# Altium PCB EEM_FMC_Carrier.PcbDoc (part 18 of 19)
Units mm, origin at the board's own origin, x right, y up, seen from the top; angles counter-clockwise.
Board outline 222.9 x 100 mm, 6 copper layers (TopLayer, MidLayer1, MidLayer2, SignalLayer1, Internal Plane 1, BottomLayer), stack 1.528 mm thick; 790 components, 743 nets, 3570 pads, 2277 vias.
Unrouted connection lines stored in the file: 3.
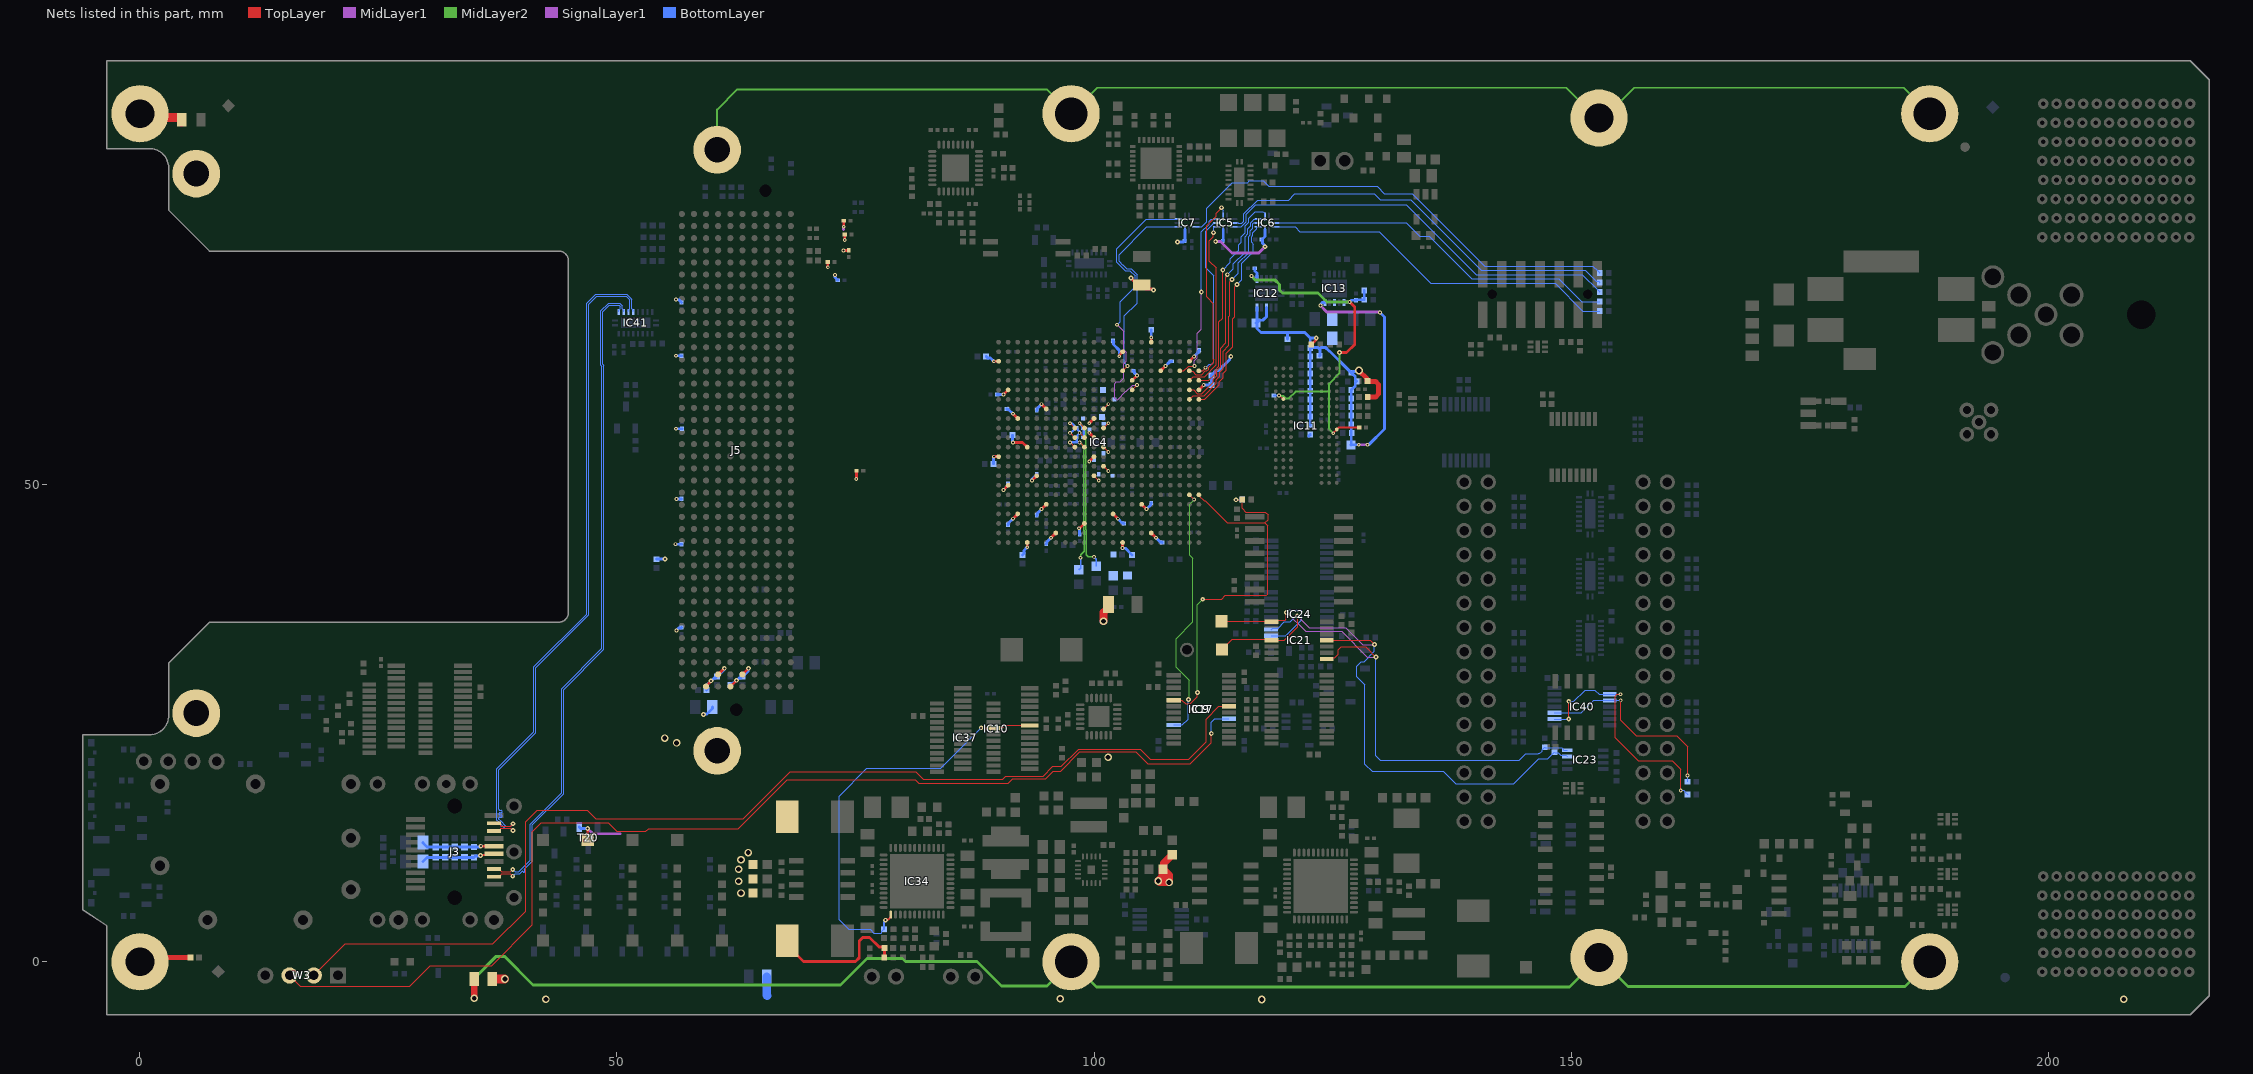
[diagram p20: the nets of this part, all layers, seen from the top]

## Via types
v1: diameter 0.4, hole 0.2, TopLayer to BottomLayer, tented both sides, 1032 vias
v2: diameter 0.5, hole 0.2, TopLayer to BottomLayer, tented both sides, 979 vias
v3: diameter 0.5, hole 0.2, TopLayer to BottomLayer, 162 vias
v4: diameter 0.8, hole 0.5, TopLayer to BottomLayer, tented both sides, 102 vias
v5: diameter 0.6, hole 0.3, TopLayer to BottomLayer, tented both sides, 2 vias

## Nets (pads, with @x,y where several pads share a name; then routed paths per layer and width w, separated by ;. In a path a pad name is that pad's centre, name@x,y a point inside that pad or via, vN(x,y) a via of type N, cw(c..) or ccw(c..) an arc to the next point about the centre after c; other vN are vias at no path point) (continued)
SFP_RD_N: IC41.12 J3.12 | length 68.7
  TopLayer w0.085: J3.12@37.1,8.925 37.65,8.925 37.808,9.082 37.808,9.099 37.928,9.219 38.744,9.219 38.831,9.219 v2(39.075,8.975)
  BottomLayer w0.085: v2(39.075,8.975) 39.319,9.219 39.807,9.219 39.869,9.281 40.03,9.442 cw(c40.095,9.377) 40.161,9.442 40.179,9.423 ccw(c40.245,9.489) 40.31,9.423 ccw(c40.245,9.489) 40.31,9.554 40.291,9.573 cw(c40.357,9.638) 40.291,9.704 40.444,9.856 41.125,10.537 41.125,14.35 44.4,17.625 44.4,28.525 48.637,32.762 48.637,62.513 48.575,62.575 48.525,62.625 48.525,68.15 49.2,68.825 50.219,68.825 50.344,68.7 50.344,68.553 50.344,68.432 50.294,68.382 50.283,68.382 50.2,68.3 IC41.12@50.2,68.125
SFP_RD_P: IC41.13 J3.13 | length 68.8
  TopLayer w0.085: J3.13@37.1,9.725 37.65,9.725 37.808,9.567 37.808,9.551 37.928,9.431 38.024,9.431 38.657,9.431 38.831,9.431 v2(39.075,9.675)
  BottomLayer w0.085: v2(39.075,9.675) 39.319,9.431 39.719,9.431 40.913,10.625 40.913,14.438 44.188,17.713 44.188,28.613 48.425,32.85 48.425,62.425 48.313,62.537 48.313,68.238 49.112,69.037 50.307,69.037 50.556,68.788 50.556,68.64 50.556,68.432 50.606,68.382 50.618,68.382 50.7,68.3 IC41.13@50.7,68.125
SFP_TD_N: IC41.14 J3.19 | length 69.1
  TopLayer w0.085: J3.19@37.1,14.525 37.634,14.525 37.791,14.367 37.791,14.281 37.841,14.231 38.856,14.231 v2(39.1,14.475)
  BottomLayer w0.085: v2(39.1,14.475) 38.856,14.231 38.344,14.231 37.748,14.827 37.625,14.95 37.625,15.046 cw(c37.743,15.046) 37.743,15.163 37.846,15.163 ccw(c37.846,15.281) 37.846,15.398 37.743,15.398 cw(c37.743,15.516) 37.743,15.633 37.846,15.633 ccw(c37.846,15.751) 37.846,15.868 37.743,15.868 cw(c37.743,15.986) 37.625,15.986 37.625,16.228 37.625,20.15 41.487,24.012 41.487,30.825 47.025,36.363 47.025,68.925 47.875,69.775 50.95,69.775 51.344,69.381 51.344,68.432 51.294,68.382 51.282,68.382 51.2,68.3 IC41.14@51.2,68.125
SFP_TD_P: IC41.15 J3.18 | length 69.2
  TopLayer w0.085: J3.18@37.1,13.725 37.634,13.725 37.791,13.882 37.791,13.969 37.841,14.019 38.856,14.019 v2(39.1,13.775)
  BottomLayer w0.085: v2(39.1,13.775) 38.856,14.019 38.256,14.019 37.55,14.725 37.413,14.862 37.413,20.238 41.275,24.1 41.275,30.913 46.813,36.451 46.813,69.013 47.787,69.987 51.038,69.987 51.556,69.469 51.556,68.432 51.606,68.382 51.618,68.382 51.7,68.3 IC41.15@51.7,68.125
SFP_VCCR: C14.2 C17.2 C18.2 C19.2 C20.1 J3.15 L6.1 | length 7.8
  TopLayer w0.25: v2(35.7,11.15) 35.768,11.15 35.818,11.2 36.975,11.2 J3.15@37.1,11.325
  BottomLayer w0.3: L6.1@29.65,10.5 29.65,10.525 30.075,10.95 C20.1@35,10.95 35.16,11.11 35.606,11.11 35.646,11.15 v2(35.7,11.15)
SFP_VCCT: C301.2 C302.2 C303.2 C321.2 C322.1 J3.16 L7.1 | length 7.7
  TopLayer w0.25: v2(35.725,12.125) J3.16@37.1,12.125
  BottomLayer w0.3: L7.1@29.65,12.5 29.65,12.465 30.075,12.04 C301.2@31,12.04 35.586,12.04 35.671,12.125 v2(35.725,12.125)
SHARED_BUS_0: IC6.5 R137.1 | length 37.7
  BottomLayer w0.125: IC6.5@119.023,77.05 121.073,77.05 121.583,76.54 129.885,76.54 135.3,71.125 148.323,71.125 151.248,68.2 R137.1@153.028,68.2
SHARED_BUS_1: IC5.5 R139.1 | length 43.6
  BottomLayer w0.125: IC5.5@114.648,77.05 115.426,77.05 115.948,77.572 115.948,77.75 115.948,78.355 116.968,79.375 132.725,79.375 140.075,72.025 151.203,72.025 152.781,70.447 152.801,70.447 153.028,70.22 R139.1@153.028,70.2
SHARED_BUS_2: IC6.4 R135.1 | length 37.4
  BottomLayer w0.125: IC6.4@119.023,77.45 132.75,77.45 134.126,76.074 135.124,76.074 139.598,71.6 148.698,71.6 151.111,69.187 152.064,69.187 152.076,69.2 R135.1@153.028,69.2
SHARED_BUS_3: IC7.5 R132.1 | length 49.2
  BottomLayer w0.125: IC7.5@110.648,77.05 111.273,77.05 111.8,77.577 111.8,77.916 111.798,77.918 111.798,79 114.483,81.685 116.11,81.685 116.288,81.863 117.737,81.863 118.325,81.275 129.698,81.275 130.448,80.525 133.35,80.525 140.95,72.925 152.303,72.925 152.781,72.447 152.801,72.447 153.028,72.22 R132.1@153.028,72.2
SHARED_BUS_4: IC5.4 R134.1 | length 44
  BottomLayer w0.125: IC5.4@114.648,77.45 114.654,77.444 115.098,77.444 115.13,77.413 115.462,77.413 115.698,77.648 115.698,78.407 117.14,79.85 120.4,79.85 121.05,80.5 129.4,80.5 130.025,79.875 133.192,79.875 140.592,72.475 151.473,72.475 152.624,71.324 152.904,71.324 R134.1@153.028,71.2
SHARED_BUS_DIR_0: IC4.F21 IC6.10 | length 22.5
  TopLayer w0.1: IC4.F21@109.998,59.95 110.43,59.95 110.815,59.565 110.833,59.565 110.837,59.561 111.284,59.561 112.498,60.775 112.498,61.05 112.873,61.425 112.873,61.941 113.287,62.355 113.287,64.339 113.823,64.875 113.823,71.77 113.976,71.923 v2(113.976,72.028)
  BottomLayer w0.125: v2(113.976,72.028) 114.598,72.65 114.598,73.15 115.848,74.4 115.848,76.024 116.125,76.301 116.125,76.85 116.415,77.14 116.415,77.489 116.676,77.75 116.762,77.836 117.209,77.836 IC6.10@117.223,77.85
SHARED_BUS_DIR_1: IC4.D20 IC5.10 | length 18.4
  TopLayer w0.1: IC4.D20@108.998,61.95 109.423,61.95 109.923,62.45 v1(110.523,62.45)
  SignalLayer1 w0.1: v1(110.523,62.45) 110.523,63.014 110.824,63.315 110.824,65.865 111.248,66.289 111.248,66.45 v2(111.248,70.2)
  BottomLayer w0.125: v2(111.248,70.2) 111.248,76.5 112.064,77.316 112.064,77.616 112.198,77.75 112.298,77.85 IC5.10@112.848,77.85
SHARED_BUS_DIR_2: IC4.E22 IC6.1 | length 22.2
  TopLayer w0.1: IC4.E22@110.998,60.95 112.023,60.95 112.684,61.611 112.684,62.019 113.098,62.433 113.098,67.075 113.5,67.477 v2(113.5,72.504)
  BottomLayer w0.125: v2(113.5,72.504) 114.298,73.302 114.298,73.7 115.189,74.591 115.189,75.159 115.437,75.407 115.437,75.996 115.875,76.434 115.875,77.175 116.198,77.498 116.198,77.75 116.198,77.922 116.901,78.625 117.701,78.625 117.832,78.494 117.858,78.494 117.923,78.43 IC6.1@117.923,78.1
SHARED_BUS_DIR_3: IC4.F15 IC7.10 | length 30.1
  TopLayer w0.125: IC4.F15@103.998,59.95 v1(104.498,60.45)
  SignalLayer1 w0.125: v1(102.423,66.775) 102.45,66.775 103.123,66.102 103.123,64.15 103.398,63.875 103.398,62.95 103.123,62.675 103.123,61.175 102.737,60.789 102.358,60.789 102.16,60.59 102.16,60.212 102.16,59.087 102.321,58.925 102.473,58.925 103.337,59.789 103.387,59.789 104.048,60.45 v1(104.498,60.45)
  BottomLayer w0.125: v1(102.423,66.775) 102.748,67.1 102.748,69.2 104.298,70.75 104.298,71.9 103.762,72.436 103.292,72.436 102.409,73.319 102.409,74.761 105.5,77.852 108.189,77.852 108.191,77.85 IC7.10@108.848,77.85
SHARED_BUS_DIR_4: IC4.D21 IC5.1 | length 21.6
  TopLayer w0.1: IC4.D21@109.998,61.95 110.031,61.917 110.331,61.917 110.687,61.561 111.271,61.561 111.646,61.936 111.838,61.936 112.037,62.135 112.037,62.327 112.553,62.843 112.553,63.124 112.498,63.179 112.498,69 111.8,69.698 111.8,77.152 112.398,77.75 112.812,78.164 112.812,78.489 v2(113.373,79.05)
  BottomLayer w0.1: v2(113.373,79.05) 113.373,78.966 113.548,78.791 IC5.1@113.548,78.1
SHARED_BUS_VADJ_0: IC4.G22 IC6.8 | length 21.3
  TopLayer w0.1: IC4.G22@110.998,58.95 111.623,58.95 113.148,60.475 113.148,60.825 113.548,61.225 113.548,61.7 113.848,62 113.848,63.775 114.548,64.475 114.548,67.425 114.748,67.625 114.748,70.75 v2(115.001,71.003)
  BottomLayer w0.125: v2(115.001,71.003) 115.473,71.475 115.473,73.2 116.698,74.425 116.698,75.225 116.522,75.401 116.522,76.009 116.65,76.137 116.65,76.427 117.059,76.836 117.059,77.015 117.093,77.05 IC6.8@117.223,77.05
SHARED_BUS_VADJ_1: IC4.E21 IC5.8 | length 18.7
  TopLayer w0.1: IC4.E21@109.998,60.95 110.398,61.35 111.598,61.35 112.823,62.575 112.823,72.729 112.098,73.454 112.098,75.598 112.522,76.022 v2(112.522,76.427)
  BottomLayer w0.1: v2(112.522,76.427) 112.557,76.461 112.557,77.004 112.603,77.05 IC5.8@112.848,77.05
SHARED_BUS_VADJ_2: IC4.G21 IC6.9 | length 22.4
  TopLayer w0.1: IC4.G21@109.998,58.95 110.399,59.351 111.549,59.351 112.823,60.625 112.823,61 113.198,61.375 113.198,61.8 113.548,62.15 113.548,64.025 114.148,64.625 114.148,67.65 114.223,67.725 114.223,71.275 v2(114.476,71.528)
  BottomLayer w0.125: v2(114.476,71.528) 115.098,72.15 115.098,73.25 116.198,74.35 116.198,75.987 116.4,76.189 116.4,76.652 116.648,76.9 116.648,77.35 116.748,77.45 IC6.9@117.223,77.45
SHARED_BUS_VADJ_3: IC4.D14 IC7.8 | length 21.6
  TopLayer w0.125: IC4.D14@102.998,61.95 v1(103.498,62.45)
  BottomLayer w0.125: v1(103.498,62.45) 103.173,62.775 103.173,66.45 103.173,67.7 104.512,69.039 104.512,72.036 103.898,72.65 103.423,72.65 103,73.074 102.957,73.074 102.623,73.407 102.623,74.125 105.547,77.048 108.189,77.048 108.191,77.05 IC7.8@108.848,77.05
SHARED_BUS_VADJ_4: IC4.D22 IC5.9 | length 17.3
  TopLayer w0.1: IC4.D22@110.998,61.95 111.373,61.95 v1(111.698,62.275)
  BottomLayer w0.125: v1(111.698,62.275) 112.055,62.632 112.36,62.632 112.566,62.838 112.566,62.918 112.573,62.925 112.573,71.9 111.723,72.75 111.723,76.6 112.51,77.387 112.51,77.392 IC5.9@112.568,77.45
SPI_SCL: B3.1 IC21.4 IC21.11 IC23.3 IC24.2 R103.1 | length 65.5
  TopLayer w0.125: B3.1@113.4,32.725 114.509,33.834 118.464,33.834 IC21.4@118.598,33.7 119.948,33.7 121.35,35.102 121.35,36.2 v2(121.3,36.25) ; IC21.11@124.398,33.7 128.975,33.7 v2(129.4,33.275)
  SignalLayer1 w0.125: v2(121.3,36.25) 122.55,35 126.398,35 128.153,33.245 v2@129.37,33.245
  BottomLayer w0.125: IC24.2@118.56,34.825 118.722,34.987 119.317,34.987 119.954,35.625 120.575,35.625 121.2,36.25 v2(121.3,36.25) ; v2(129.4,33.275) 129.4,32.55 128.323,31.473 128.023,31.473 127.55,31 127.55,29.875 128.396,29.029 128.396,20.7 129.146,19.95 136.625,19.95 137.9,18.675 144,18.675 146.623,21.298 147.546,21.298 148.228,21.98 R103.1@148.248,21.98 148.325,21.903 148.672,21.903 148.925,21.65 149.473,21.65 IC23.3@149.598,21.525
SPI_SDA: B2.1 IC21.1 IC21.8 IC23.4 IC24.1 R102.1 | length 63.2
  TopLayer w0.125: B2.1@113.375,35.7 118.548,35.7 IC21.1@118.598,35.65 118.761,35.813 120.037,35.813 120.175,35.95 v2(120.175,36.625) ; IC21.8@124.398,31.75 124.53,31.882 125.232,31.882 125.6,32.25 125.6,32.7 125.925,33.025 128.475,33.025 v2(129.55,31.95)
  SignalLayer1 w0.125: v2(120.175,36.625) 122.175,34.625 125.975,34.625 128.65,31.95 v2(129.55,31.95)
  BottomLayer w0.125: IC24.1@118.56,34.175 120.1,34.175 121.8,35.875 121.8,36.675 121.574,36.902 120.452,36.902 v2(120.175,36.625) ; v2(129.55,31.95) 129.55,21.619 130.019,21.15 144.575,21.15 145.244,21.819 146.581,21.819 146.61,21.849 146.741,21.849 146.977,22.084 146.977,22.168 147,22.192 147,22.253 147.228,22.48 R102.1@147.248,22.48 ; R102.1@147.249,22.479 147.307,22.421 149.021,22.421 149.11,22.332 149.11,22.312 149.248,22.175 IC23.4@149.598,22.175
STRIP1: B6.1 B7.1 B8.1 B9.1 C212.1 M1.1 M2.1 M3.1 M4.1 M5.1 M6.1 M7.1 M8.1 R120.2 R126.1 | length 315.6
  TopLayer w0.5: M4.1@0,0 0.45,0.45 C212.1@5.298,0.45
  TopLayer w0.7: v4(35.048,-3.825) R120.2@35.048,-1.8
  TopLayer w0.9: M3.1@0,88.9 0.4,88.5 4.35,88.5 R126.1@4.35,88
  MidLayer2 w0.2: B8.1@60.5,85.119 60.5,89.325 62.625,91.45 95.05,91.45 M5.1@97.6,88.9 100.324,91.624 149.501,91.624 152.675,88.45 M1.1@152.93,88.45 153.193,88.713 153.713,88.713 156.624,91.624 184.876,91.624 M6.1@187.6,88.9
  MidLayer2 w0.3: v4(35.048,-3.825) 35.048,-1.727 37.35,0.575 38.2,0.575 41.2,-2.425 73.432,-2.425 76.217,0.36 79.91,0.36 80.245,0.025 87.75,0.025 90.3,-2.525 95.075,-2.525 M7.1@97.6,0 100.249,-2.649 149.831,-2.649 M2.1@152.93,0.45 155.98,-2.6 185,-2.6 M8.1@187.6,0
STRIP2: R119.1 | length 2
  BottomLayer w0.9: R119.1@65.698,-1.55 65.698,-3.5 65.748,-3.55
  other v4: 42.548,-3.925 96.473,-3.875
STRIP3: R120.1 | length 1.3
  TopLayer w0.9: R120.1@36.948,-1.8 v4(38.248,-1.8)
  other v4: 117.573,-3.95 207.937,-3.93
Switch_I2C.SCL: IC40.2 IC40.9 R77.2 | length 25.9
  TopLayer w0.114: v2(149.761,25.441) v2(149.76,27.301) ; v1(155.2,28.05) 155.172,28.022 154.797,28.022 154.625,27.85 154.625,23.505 157.073,21.057 160.629,21.057 161.504,20.181 161.504,17.961 v1(161.5,17.958)
  BottomLayer w0.114: IC40.9@148.254,25.446 148.278,25.423 149.742,25.423 v2(149.761,25.441) ; v2(149.76,27.301) 150.301,27.301 151.488,28.488 152.512,28.488 152.954,28.046 IC40.2@154.054,28.046 155.196,28.046 v1(155.2,28.05) ; v1(161.5,17.958) 161.797,17.958 R77.2@161.976,17.779 ; R77.2@161.977,17.779 162.21,17.546 R77.2@162.21,17.526
Switch_I2C.SDA: IC40.3 IC40.10 R3.2 | length 21.4
  TopLayer w0.114: v1(155.205,27.41) 155.205,25.32 156.852,23.673 161.086,23.673 162.242,22.517 162.242,19.553 v1(162.212,19.524)
  BottomLayer w0.114: IC40.10@148.254,26.096 151.079,26.096 152.379,27.396 IC40.3@154.054,27.396 154.065,27.407 155.201,27.407 v1(155.205,27.41) ; R3.2@162.21,18.872 162.21,19.522 v1(162.212,19.524)
UART_RXD: IC9.19 W3.2 | length 116.8
  TopLayer w0.125: W3.2@18.215,-1.425 21.515,1.875 37,1.875 40.45,5.325 40.45,14.7 41.625,15.875 46.875,15.875 47.75,15 63.223,15 68.159,19.936 81.312,19.936 82.123,19.125 90.425,19.125 90.75,19.45 94.673,19.45 95.698,20.475 96.559,20.475 98.379,22.294 104.856,22.294 105.904,21.246 109.946,21.246 111.748,23.048 111.748,25.45 113.073,26.775 IC9.19@114.148,26.775
UART_RXD_2V5: IC4.U22 IC9.5 R35.1 R36.2 | length 42.5
  TopLayer w0.125: IC9.5@108.348,27.425 109.223,27.425 109.623,27.025 110.098,27.025 110.848,27.775 v2(110.848,28.225) ; IC4.U22@110.998,48.95 110.998,48.87 111.545,48.322 111.652,48.322 113.975,46 117.898,46 ; v2(111.398,38) 113.375,38 113.775,38.4 118.048,38.4 118.192,38.544 118.192,45.706 118.093,45.805 117.898,46 ; v2(114.873,48.425) 115.47,48.425 R35.1@115.511,48.467 ; R35.1@115.528,48.45 115.528,48.425 115.528,47.52 115.899,47.149 117.949,47.149 118.254,46.844 118.254,46.356 117.898,46
  MidLayer2 w0.125: v2(110.848,28.225) 110.848,37.45 v2(111.398,38)
  BottomLayer w0.125: v2(114.873,48.425) 115.478,48.425 R36.2@115.528,48.475
UART_TXD: IC17.20 W3.3 | length 119.6
  TopLayer w0.125: W3.3@15.675,-1.425 16.8,-2.55 28.275,-2.55 30.425,-0.4 36.85,-0.4 41.125,3.875 41.125,13.65 42.05,14.575 49.075,14.575 49.975,13.675 53.025,13.675 53.314,13.964 62.712,13.964 67.848,19.1 81.248,19.1 81.623,18.725 91.012,18.725 91.474,19.187 91.63,19.187 ; 91.631,19.188 93.465,19.188 ; 93.466,19.187 94.917,19.187 95.73,20 96.518,20 98.52,22.002 104.398,22.002 105.65,20.75 110.075,20.75 112.298,22.973 v2(112.298,23.925)
  BottomLayer w0.125: v2(112.298,23.925) 112.298,25.1 112.673,25.475 IC17.20@114.148,25.475
UART_TXD_2V5: IC4.U21 IC17.4 | length 27.2
  TopLayer w0.125: IC4.U21@109.998,48.95 v1(110.498,48.45)
  MidLayer2 w0.125: v2(109.898,27.5) 109.969,27.571 109.969,29.529 108.598,30.9 108.598,33.871 110.373,35.646 110.373,42.279 110.202,42.45 110.023,42.629 110.023,47.975 v1(110.498,48.45)
  BottomLayer w0.125: IC17.4@108.348,24.825 109.273,24.825 109.898,25.45 v2(109.898,27.5)
VADJ_ENABLE: IC10.8 IC34.37 IC37.20 R221.2 | length 43.5
  TopLayer w0.125: v2(88.175,24.525) 89.45,24.525 90.45,24.525 90.7,24.775 IC10.8@93.248,24.775
  TopLayer w0.2: v2(78.13,4.369) 78.188,4.426 78.428,4.426 78.7,4.698 IC34.37@78.7,4.949
  BottomLayer w0.125: R221.2@77.998,3.42 77.978,3.42 77.75,3.193 77.75,3.072 77.677,2.999 76.925,2.999 76.523,3.4 74.298,3.4 73.273,4.425 73.273,17.375 76.168,20.27 83.92,20.27 v2(88.175,24.525)
  BottomLayer w0.2: R221.2@77.998,3.42 77.998,4.155 78.13,4.288 v2(78.13,4.369)
VADJ_FMC: C49.2 C50.2 C51.2 C100.2 C115.2 C116.2 C117.2 C118.2 C119.2 C120.2 C121.2 C122.2 C123.2 C124.2 C125.2 C126.2 C127.2 C128.2 C129.2 C130.2 C131.2 C132.2 C133.2 C134.2 C141.2 C142.2 C143.2 C144.2 C171.2 C176.2 C193.2 C194.2 C195.2 C196.2 C197.1 C198.1 C206.2 C261.2 C272.2 C273.2 C274.2 C290.2 C291.2 C292.2 C293.2 C294.2 C295.2 C296.2 C297.2 IC4.A17 IC4.AA7 IC4.AA17 IC4.AB4 IC4.AB14 IC4.B14 IC4.C1 IC4.C21 IC4.D18 IC4.E15 IC4.F2 IC4.F22 IC4.H6 IC4.J3 IC4.M4 IC4.N1 IC4.R5 IC4.T2 IC4.V6 IC4.V16 IC4.W3 IC4.W13 IC4.Y10 IC5.7 IC6.7 IC7.7 J5.e39 J5.f40 J5.g39 J5.h40 L24.2 L25.2 R17.2 R215.2 T20.1 TP10.1 | length 96.1
  TopLayer w0.3: v2(46.925,13.975) 46.937,13.963 TP10.1@46.937,12.75 ; J5.h40@59.338,28.859 59.338,28.899 59.848,29.409 v2(59.848,29.45) ; J5.g39@60.608,30.129 61.239,30.76 v2(61.248,30.76) ; J5.f40@61.878,28.859 61.881,28.859 62.524,29.502 v2(62.526,29.502) ; J5.e39@63.148,30.129 63.779,30.76 v2(63.788,30.76) ; L24.2@67.848,2.2 67.848,1.7 68.898,0.65 68.91,0.65 69.535,0.025 74.998,0.025 75.398,0.425 75.398,2.183 75.754,2.539 76.484,2.539 77.482,1.541 77.957,1.541 C261.2@78.048,1.45 78.048,0.47 R215.2@78.028,0.45 ; v1(72.098,72.8) C293.2@72.098,73.35 ; v1@73.751,74.574 C171.2@74.298,74.575 ; v1(73.773,77.05) C290.2@73.773,77.675 ; v1(73.873,75.65) C176.2@73.873,76.25 ; v1(75.075,50.602) 75.075,50.629 75.098,50.652 C193.2@75.098,51.475 ; v1(89.498,52.95) IC4.N1@89.998,52.95 ; v1(89.498,62.95) IC4.C1@89.998,62.95 ; v1(90.498,49.45) IC4.T2@90.998,49.95 ; v1(90.498,59.45) IC4.F2@90.998,59.95 ; v1(91.498,46.45) IC4.W3@91.998,46.95 ; v1(91.498,54.45) 92.498,54.45 IC4.M4@92.998,53.95 ; v1(91.498,57.45) IC4.J3@91.998,56.95 ; v1(92.998,43.45) IC4.AB4@92.998,43.95 ; v1(93.498,50.45) IC4.R5@93.998,50.95 ; v1(94.498,47.45) IC4.V6@94.998,47.95 ; v1(94.498,58.45) IC4.H6@94.998,57.95 ; v1(95.498,44.45) IC4.AA7@95.998,44.95 ; v1(98.43,45.45) 98.449,45.469 98.517,45.469 IC4.Y10@98.998,45.95 ; IC4.W13@101.998,46.95 v1(102.498,46.45) ; v1(102.648,63.475) 102.667,63.494 102.667,63.619 IC4.B14@102.998,63.95 ; v1(102.998,43.375) IC4.AB14@102.998,43.95 ; v2(103.873,71.675) 104.173,71.375 104.573,71.375 C100.2@104.998,70.95 105.423,70.525 106.094,70.525 106.194,70.425 v2(106.248,70.425) ; IC4.E15@103.998,60.95 v1(104.498,61.45) ; IC4.V16@104.998,47.95 v1(105.498,47.45) ; IC4.AA17@105.998,44.95 v1(106.498,44.45) ; IC4.A17@105.998,64.95 v1(105.998,65.45) ; IC4.D18@106.998,61.95 v1(107.498,62.45) ; IC4.C21@109.998,62.95 v1(110.498,63.45) ; IC4.F22@110.998,59.95 v1(111.498,60.45)
  MidLayer1 w0.3: v2(46.925,13.975) 47.475,13.425 50.325,13.425 ; 73.754,76.756 73.754,77.031 v1(73.773,77.05)
  SignalLayer1 w0.3: v2(112.75,75.5) 113.248,75.5 114.448,74.3 117.276,74.3 v2(117.926,74.95)
  BottomLayer w0.3: T20.1@46.05,14.15 46.05,14.125 46.2,13.975 v2(46.925,13.975) ; R17.2@54.15,42.22 54.153,42.223 55.023,42.223 v2(55.025,42.225) ; v1(56.148,43.775) C296.2@56.773,43.775 ; v1@56.164,69.45 v1(56.194,69.42) 56.213,69.401 56.472,69.401 56.698,69.175 56.723,69.175 56.773,69.125 C294.2@56.773,69.1 ; v1(56.173,55.875) C295.2@56.798,55.875 ; v1(56.198,63.525) C292.2@56.773,63.525 ; v1(56.223,34.725) 56.473,34.975 56.723,34.975 56.773,35.025 C297.2@56.773,35.05 ; v1(56.223,48.525) C291.2@56.773,48.525 ; v2(59.08,25.934) 59.119,25.972 59.42,25.972 59.998,26.55 C197.1@59.998,26.725 ; C198.1@59.373,28.5 59.464,28.591 59.464,29.066 v2(59.848,29.45) ; v2@59.902,29.45 60.192,29.74 60.338,29.74 C206.2@60.498,29.9 61.21,30.612 v2@61.21,30.722 ; C195.2@61.873,29 62.033,29.16 62.13,29.16 v2@62.472,29.502 ; v2@62.58,29.502 62.819,29.74 63.013,29.74 C196.2@63.173,29.9 63.75,30.477 v2@63.75,30.722 ; v1(72.848,72) 72.848,71.75 73.073,71.525 73.073,71.5 73.123,71.45 C194.2@73.148,71.45 ; C130.2@88.698,63.45 88.858,63.29 89.158,63.29 v1(89.498,62.95) ; C131.2@89.448,52.2 89.448,52.873 89.498,52.923 v1(89.498,52.95) ; C127.2@89.848,59.45 v1(90.498,59.45) ; v1(90.498,49.45) 90.948,49.9 90.948,50.05 C133.2@90.998,50.1 ; C122.2@90.848,57.95 90.898,57.9 91.048,57.9 v1(91.498,57.45) ; C141.2@90.998,45.8 91.048,45.85 91.048,46 v1(91.498,46.45) ; C121.2@91.448,55.2 91.448,54.527 91.498,54.477 v1(91.498,54.45) ; C116.2@92.498,42.65 92.658,42.81 92.658,43.11 v1(92.998,43.45) ; v1(93.498,50.45) 93.517,50.469 93.517,50.619 93.923,51.025 93.948,51.025 93.998,51.075 C132.2@93.998,51.1 ; C144.2@93.998,46.8 94.048,46.85 94.048,47 v1(94.498,47.45) ; C143.2@93.998,57.8 94.048,57.85 94.048,58 v1(94.498,58.45) ; C123.2@94.998,43.8 95.048,43.85 95.048,44 v1(95.498,44.45) ; v1(98.43,45.45) 98.43,45.423 98.498,45.355 C118.2@98.498,44.8 ; C129.2@101.998,65.1 102.048,65.05 102.048,64.7 102.648,64.1 v1(102.648,63.475) ; v1(102.498,46.45) 102.948,46 103.098,46 C134.2@103.148,45.95 ; v1(102.998,43.375) 103.017,43.356 103.292,43.356 C120.2@103.998,42.65 ; C128.2@104.148,61.95 104.173,61.95 104.223,61.9 104.223,61.752 104.498,61.477 v1(104.498,61.45) ; v1(105.498,47.45) 105.948,47.9 105.948,48.05 C119.2@105.998,48.1 ; v1(105.998,65.45) C125.2@105.998,66.25 ; v1(106.498,44.45) 106.948,44 107.098,44 C117.2@107.148,43.95 ; v1(107.498,62.45) 107.948,62.9 108.098,62.9 C142.2@108.148,62.95 ; v2(108.748,75.45) 109.398,75.45 109.423,75.475 109.448,75.475 109.498,75.525 C51.2@109.498,75.55 109.523,75.575 109.523,76.725 IC7.7@109.548,76.75 ; v1(110.498,63.45) 110.948,63.9 110.948,64.05 C124.2@110.998,64.1 ; v1(111.498,60.45) C126.2@112.298,60.45 C115.2@112.298,61.45 112.649,61.801 112.649,61.859 112.789,61.999 113.072,61.999 114.223,63.15 114.223,63.274 114.339,63.389 v2(114.339,63.443) v2@114.345,63.45 ; v2@112.723,75.5 v2(112.75,75.5) 113.448,75.5 C49.2@113.498,75.55 113.498,75.575 113.548,75.625 IC5.7@113.548,76.75 ; C50.2@117.598,75.7 117.623,75.7 C50.2@117.673,75.75 ; IC6.7@117.923,76.75 117.923,76.025 117.673,75.775 C50.2@117.673,75.75 ; v2(117.926,74.95) 117.888,74.988 117.888,75.11 117.673,75.325 C50.2@117.673,75.75
  other v1: 73.75,74.574
  other v4: 62.998,7.2 62.748,8.45 62.748,9.7 62.998,10.7 63.748,11.45 56.248,22.95 54.998,23.45
VCCAUX: C157.2 C158.2 C159.2 C160.2 C161.2 C162.2 C163.2 C164.2 C174.2 IC4.H12 IC4.K12 IC4.M12 IC4.P12 IC4.R11 L5.2 | length 3.5
  TopLayer w0.125: IC4.R11@99.998,50.95 v1(100.498,50.45) ; IC4.P12@100.998,51.95 v1(101.498,51.45) ; IC4.M12@100.998,53.95 v1(101.498,53.45) ; IC4.K12@100.998,55.95 v1(101.498,56.45) ; IC4.H12@100.998,57.95 v1(101.498,58.45)
VCCBRAM: C110.2 C112.2 C113.2 C243.2 C320.2 IC4.J11 IC4.L11 IC4.N11 L16.2 | length 10.1
  TopLayer w0.3: v1(99.498,52.45) IC4.N11@99.998,52.95 ; v1(99.498,55.45) IC4.L11@99.998,54.95 ; v1(99.498,56.45) IC4.J11@99.998,56.95
  TopLayer w0.8: v4(100.998,35.7) 100.998,36.625 101.498,37.125 C110.2@101.498,37.45 ; L16.2@108.1,11.117 107.323,10.34 107.323,9.775 C243.2@107.248,9.7 ; C243.2@107.248,9.7 107.873,9.075 v4(107.873,8.325) 106.873,8.325 v4(106.723,8.475) 107.173,8.925 107.173,9.625 C243.2@107.248,9.7
  other v4: 101.475,21.45
VREF_DDR3: C78.2 C79.2 C93.2 C95.2 IC11.H1 IC11.M8 IC12.6 IC13.1 R74.1 R75.2 | length 42.6
  TopLayer w0.167: v1(119.405,59.36) 119.447,59.36 119.807,59 IC11.M8@119.848,59 ; v1(125.073,55.4) 125.073,55.425 IC11.H1@125.448,55.8
  TopLayer w0.2: IC11.H1@125.448,55.8 125.642,55.994 C79.2@127.915,55.994
  TopLayer w0.3: v2(125.723,63.875) 126.481,63.875 127.325,64.719 127.325,68.644 v1(126.8,69.169)
  MidLayer2 w0.2: v1(119.405,59.36) 119.444,59.322 119.825,59.322 120.091,59.055 120.421,59.055 121.128,59.762 124.648,59.762 ; 124.648,60.6 124.648,59.762 ; 124.662,60.614 125.723,61.675 v2(125.723,63.875) ; v1(125.073,55.4) 124.648,55.825 124.648,59.762
  MidLayer2 w0.3: v1(116.5,71.894) 116.944,71.45 118.994,71.45 119.45,70.994 119.45,70.394 119.744,70.1 123.494,70.1 124.425,69.169 v1(126.8,69.169)
  BottomLayer w0.2: C78.2@118.848,59.375 118.856,59.367 119.398,59.367 v1(119.405,59.36)
  BottomLayer w0.3: v1(116.5,71.894) 116.731,71.663 117.067,71.663 IC12.6@117.07,71.573 117.07,72.199 116.848,72.421 C93.2@116.848,72.7 ; IC13.1@126.2,69.094 126.275,69.169 v1(126.8,69.169) 126.975,69.344 C95.2@127.45,69.344 127.5,69.394 R74.1@128.33,69.394 R75.2@128.33,70.369
VTT_DDR3: C89.2 C90.2 C96.2 C304.2 IC12.3 IC12.5 IC13.3 IC13.5 R42.2 R43.2 R46.2 R47.2 R48.2 R49.2 R50.2 R51.2 R52.2 R53.2 R54.2 R55.2 R56.2 R57.2 R58.2 R59.2 R60.2 R61.2 R62.2 R63.1 R64.1 R65.1 R247.2 R248.2 | length 66.7
  TopLayer w0.3: R48.2@122.778,64.7 122.778,64.72 122.918,64.86 122.938,64.86 123.26,65.182 123.26,65.337 v2(123.298,65.375)
  TopLayer w0.5: v4(127.773,61.975) 128.628,61.12 128.628,60.92 R56.2@128.708,60.84 ; R43.2@128.718,59.2 129.514,59.2 129.807,59.493 129.807,60.547 129.514,60.84 R56.2@128.708,60.84 ; R56.2@128.728,60.84 R56.2@128.708,60.84
  SignalLayer1 w0.3: v1(123.725,68.794) 124.4,68.119 129.925,68.119 v1(129.975,68.069) ; v1(127.75,54.194) v1(128.675,54.194)
  BottomLayer w0.3: C90.2@116.998,66.95 117.07,67.022 IC12.5@117.07,68.573 ; IC12.3@118.07,68.573 118.07,67.622 117.691,67.243 117.323,67.243 117.07,66.991 117.07,66.378 117.498,65.95 120.323,65.95 ; R47.2@120.298,65.27 120.298,65.925 120.323,65.95 ; 122.268,65.8 122.668,65.4 ; R65.1@122.508,55.115 122.528,55.115 122.668,55.255 R65.1@122.668,55.275 ; R63.1@122.668,56.25 R64.1@122.668,57.15 R51.2@122.668,58.05 R42.2@122.668,58.95 R49.2@122.668,59.85 R57.2@122.668,60.75 R60.2@122.668,61.65 R55.2@122.668,62.55 R50.2@122.668,63.45 R53.2@122.668,64.35 122.668,65.4 ; R53.2@122.668,64.375 123.472,64.375 123.648,64.199 ; v2(123.298,65.375) 123.273,65.4 122.668,65.4 ; R52.2@123.648,63.52 123.698,63.57 123.698,64.26 123.813,64.375 124.298,64.375 124.648,64.025 124.693,64.025 126.808,61.91 126.828,61.91 126.968,61.77 R54.2@126.968,61.75 127.097,61.879 127.677,61.879 v4(127.773,61.975) ; v1(123.725,68.794) 123.725,68.894 123.925,69.094 IC13.5@124.2,69.094 ; C89.2@126.923,54.175 C89.2@126.942,54.194 ; R54.2@126.968,61.73 127.108,61.59 127.128,61.59 127.378,61.34 127.378,60.99 R59.2@127.518,60.85 127.378,60.71 127.378,60.36 127.128,60.11 127.108,60.11 126.968,59.97 R62.2@126.968,59.95 R58.2@126.968,59.05 R61.2@126.968,58.15 R247.2@126.968,57.25 R248.2@126.968,56.35 126.968,54.22 C89.2@126.942,54.194 ; v1(127.75,54.194) C89.2@126.942,54.194 ; v1(128.675,54.194) 128.8,54.194 130.45,55.844 130.45,67.594 v1(129.975,68.069) ; 120.323,65.95 122.098,65.95 122.648,65.4 122.668,65.4
XADC_GND: C97.1 C98.1 IC4.K9 IC4.L9 IC4.L10 IC4.M9 IC4.M10 L4.2 | length 21.6
  TopLayer w0.125: v1(97.498,54.45) IC4.M9@97.998,53.95 ; v1(97.498,55.45) IC4.L9@97.998,54.95 ; v1(97.498,56.45) IC4.K9@97.998,55.95 ; v1(98.498,54.45) IC4.M10@98.998,53.95 ; v1(98.498,55.45) IC4.L10@98.998,54.95
  MidLayer2 w0.15: v1(98.498,54.45) 98.921,54.027 98.921,45.211 98.958,45.173 98.958,43.01 98.598,42.65 v1(98.598,42.35)
  BottomLayer w0.15: L4.2@98.423,41.1 98.598,41.275 v1(98.598,42.35)
  BottomLayer w0.25: v1(97.498,55.45) 98.048,55.875 98.148,55.906 98.217,55.906 98.248,55.875 98.248,55.806 98.469,55.585 98.469,55.479 v1(98.498,55.45) C97.1@98.083,55.035 ; v1(97.498,56.45) 97.527,56.421 97.677,56.421 98.048,56.05 98.048,56.025 98.123,55.95 C98.1@98.148,55.95 ; v1@97.567,54.458 97.567,54.479 98.176,54.479 ; C97.1@98.151,54.991 98.176,54.991 98.176,54.599 98.296,54.479 98.469,54.479 v1(98.498,54.45)
XADC_VCC: C97.2 C98.2 IC4.K10 L3.2 | length 18.4
  TopLayer w0.125: v1(98.498,56.45) IC4.K10@98.998,55.95
  MidLayer2 w0.15: v1(98.498,56.45) 99.147,55.801 99.147,45.305 99.187,45.265 99.187,42.661 99.398,42.45 v1(99.998,42.45)
  BottomLayer w0.15: v1(99.998,42.45) 100.248,42.2 L3.2@100.248,41.45
  BottomLayer w0.279: v1(98.498,56.45) 98.498,56.417 98.763,56.153 98.763,56.01 98.823,55.95 C98.2@98.848,55.95 ; C97.2@98.851,54.991 98.866,54.991 98.927,55.051 98.927,55.89 C98.2@98.88,55.936
pads on no net: D1.2 D2.2 D5.5 D6.5 D8.5 FTG1.FTG2 FTG2.1 FTG3.1 FTG4.1 FTG5.1 FTG6.1 IC1.9 IC1.11 IC1.12 IC1.13 IC1.14 IC1.17 IC1.18 IC1.19 IC1.20 IC1.21 IC1.22 IC2.1 IC2.4 IC2.6 IC2.14 IC2.19 IC2.21 IC2.22 IC2.30 IC2.31 IC3.14 IC3.15 IC4.K13 IC4.L6 IC4.U7 IC4.V7 IC4.Y17 IC8.5 IC8.6 IC8.7 IC8.8 IC8.10 IC8.11 IC8.12 IC8.13 IC8.14 IC8.15 IC8.16 IC8.17 IC9.9 IC9.10 IC10.11 IC10.14 IC10.19 IC11.J1 IC11.J9 IC11.L1 IC11.L9 IC11.M7 IC14.4 IC15.14 IC15.15 IC15.16 IC15.17 IC17.15 IC17.16 IC17.17 IC17.18 IC17.19 IC22.3 IC22.4 IC22.5 IC22.6 IC22.11 IC22.12 IC22.13 IC24.3 IC25.7 IC26.7 IC29.7 IC29.8 IC29.12 IC29.13 IC29.16 IC29.17 IC31.3 IC31.5 IC31.6 IC32.22 IC32.26 IC32.27 IC32.28 IC32.29 IC34.22 IC35.4 IC42.5 IC43.5 IC44.1 IC44.2 IC44.3 IC44.4 IC44.5 IC44.6 IC44.7 IC44.8 IC44.11 IC44.14 IC44.19 IC44.28 IC45.11 IC45.13 IC45.14 IC45.15 IC45.16 IC45.17 IC45.18 IC45.19 IC45.20 IC46.10 IC46.11 IC46.16 J2.12 J2.15 J2.16 J3.MTG1 J3.MTG2 J5.1 J5.2 J5.b40 J6.B1 J6.L2 J7.A3 J7.A5 J7.A7 J7.A8 J7.B2 J7.B3 J7.B4 J7.B5 J7.B6 J7.B7 J7.B8 J7.C2 J7.C4 J7.C6 J7.C8 J7.D3 J7.D5 J7.D7 J7.D8 J7.E2 J7.E3 J7.E4 J7.E5 J7.E6 J7.E7 J7.E8 J7.F2 J7.F4 J7.F6 J7.F8 J7.G3 J7.G5 J7.G7 J7.H2 J7.H3 J7.H4 J7.H5 J7.H6 J7.H7 J7.H8 J7.I2 J7.I4 J7.I6 J7.I8 J7.J3 J7.J5 J7.J7 J7.K2 J7.K3 J7.K4 J7.K5 J7.K6 J7.K7 J7.K8 J7.L2 J7.L4 J7.L6 J7.L8 J10.5 LD2.3 LD13.3 LD15.3 LD18.3 OSC1.2 T7.1 T7.2 T7.7 T7.8 TR1.2

## Polygon pours and split planes (outlines as drawn)
no net on TopLayer "BAL_TOP" (solid, pour order 240): -5.9,91.899 -5.9,-3.4 216.958,-3.4 216.873,-3.315 216.873,91.976
NetC253_1 on TopLayer "NETC253_1_L01_P236" (solid, remove dead copper, pour order 236): 134.15,9.294 134.15,11.369 129.917,11.369 129.498,10.95 127.998,10.95 127.748,10.7 127.748,10.2 127.498,9.95 127.498,9.45 128.498,9.45 128.498,10.2 130.998,10.2 131.904,9.294
P12V0_SMPS on TopLayer "P12V0_SMPS_L01_P189" (solid, remove dead copper, pour order 189): 141.498,-2.55 135.498,-2.55 135.498,0.7 136.748,1.95 141.498,1.95
P3V3_FMC on TopLayer "P3V3_FMC_L01_P192" (solid, remove dead copper, pour order 192): 105.248,3.45 105.248,-0.8 104.248,-1.8 102.748,-1.8 101.498,-0.55 101.498,1.7 103.748,1.7 103.748,3.45
P12V0 on TopLayer "P12V0_L01_P243" (solid, pour order 243): 179.6,68 166.75,68 166.75,64 179.6,64
P12V0_SMPS on TopLayer "P12V0_SMPS_L01_P178" (solid, remove dead copper, pour order 178): 75.748,17.45 75.748,15.45 77.248,13.95 77.248,12.7 76.748,12.2 76.248,12.2 76.248,10.95 78.498,10.95 78.498,11.2 78.998,11.7 78.998,14.7 78.498,15.2 78.498,17.45
P3V3 on TopLayer "P3V3_L01_P182" (solid, remove dead copper, pour order 182): 88.998,2.7 88.998,-1.05 89.498,-1.55 92.998,-1.55 92.998,-0.55 91.998,0.45 91.998,2.7
P12V0 on TopLayer "P12V0_L01_P190" (solid, remove dead copper, pour order 190): 137.998,5.7 141.248,5.7 142.748,7.2 142.748,8.2 137.248,8.2 137.248,6.45
NetC275_1 on TopLayer "NETC275_1_L01_P180" (solid, remove dead copper, pour order 180): 78.498,10.95 78.498,9.95 77.248,9.95 76.998,9.7 75.748,9.7 74.998,8.95 72.248,8.95 72.248,16.95 74.998,16.95 74.998,11.45 75.498,10.95
NetC270_1 on TopLayer "NETC270_1_L01_P181" (solid, remove dead copper, pour order 181): 78.498,7.45 78.498,6.45 76.248,6.45 74.998,5.2 74.998,3.95 74.998,0.45 72.248,0.45 72.248,8.45 75.998,8.45 76.748,7.7 77.248,7.7 77.498,7.45
NetC237_1 on TopLayer "NETC237_1_L01_P184" (solid, remove dead copper, pour order 184): 120.748,6.95 120.748,5.95 117.248,5.95 116.998,5.7 116.998,2.45 114.498,2.45 114.498,6.95 115.498,7.95 117.998,7.95 118.748,7.2 119.498,7.2 119.748,6.95
STRIP3 on TopLayer "STRIP3_L01_P173" (solid, pour order 173): 214.531,-4.55 214.548,-4.55 215.788,-3.31 116.998,-3.31 116.998,-4.55
NetC227_2 on TopLayer "NETC227_2_L01_P193" (solid, remove dead copper, pour order 193): 111.498,3.2 111.498,-0.3 110.748,-1.05 105.498,-1.05 105.498,2.2 105.748,2.45 108.248,2.45 108.998,3.2
NetC255_2 on TopLayer "NETC255_2_L01_P187" (solid, remove dead copper, pour order 187): 134.1,14.7 130.748,14.7 129.748,15.7 129.748,17.95 133.748,17.95 134.1,17.598
VADJ_FMC on TopLayer "VADJ_FMC_L01_P179" (solid, remove dead copper, pour order 179): 69.248,17.2 69.248,13.45 66.498,10.7 65.248,10.7 65.248,6.7 66.498,6.7 69.248,3.95 69.248,0.45 65.748,0.45 63.498,2.7 62.498,3.7 62.498,12.95 66.748,17.2
NetC250_2 on TopLayer "NETC250_2_L01_P188" (solid, remove dead copper, pour order 188): 130.748,3.2 134.998,3.2 134.998,2.95 133.748,1.7 133.748,-0.05 130.748,-0.05
NetC264_1 on TopLayer "NETC264_1_L01_P229" (solid, remove dead copper, pour order 229): 188.033,67.809 194.533,67.809 195.485,68.761 195.485,70.503 196.291,71.309 197.879,71.309 198.533,70.655 198.533,66.809 201.283,64.059 203.366,64.059 204.335,65.028 204.335,72.007 203.533,72.809 199.783,72.809 198.533,74.059 189.283,74.059 188.033,72.809
GND on TopLayer "GND_L01_P171" (solid, pour order 171): 202.525,46.375 202.525,42.65 216.9,42.65 216.9,46.375
NetC264_2 on TopLayer "NETC264_2_L01_P226" (solid, remove dead copper, pour order 226): 188.033,67.809 188.033,64.809 190.283,62.559 196.533,62.559 198.46,64.486 198.46,70.628 197.779,71.309 196.291,71.309 195.485,70.503 195.485,68.761 194.533,67.809
NetC282_2 on TopLayer "NETC282_2_L01_P183" (solid, remove dead copper, pour order 183): 88.998,16.2 88.998,13.45 92.498,13.45 92.498,16.2
STRIP1 on TopLayer "esd1" (solid, pour order 172): -2.752,1.525 4.373,1.525 4.373,-3 36.998,-3 36.998,-4.5 -2.752,-4.5
STRIP2 on TopLayer "esd1" (solid, pour order 174): 79.931,-4.55 96.998,-4.55 96.998,-3.281 41.998,-3.281 41.998,-4.55
no net on MidLayer2 "ML2_BAL" (solid, pour order 238): -2.45,91.738 216.469,91.738 216.373,-2.62 -2.45,-2.62
P3V3 on MidLayer2 "P3V3_L03_P230" (solid, remove dead copper, pour order 230): 89.91,-1.31 88.775,-0.175 88.775,15.423 80.1,24.098 80.1,25.802 84.998,30.7 98.248,30.7 98.248,9.7 98.248,-1.43
P3V3 on MidLayer2 "P3V3_L03_P231" (solid, remove dead copper, pour order 231): 131.762,59.713 134.138,59.713 137.65,63.225 137.65,64.525 138.452,65.327 145.773,65.327 158.925,52.175 158.925,15.025 156.325,12.425 156.325,12.375 155.05,11.1 155.05,11.075 149.425,11.075 145.748,14.752 145.748,31.25 153.625,39.191 153.625,48.7 149.5,52.825 145.748,52.825 143.027,55.546 133.652,55.546 130.998,58.2 130.998,58.95
STRIP1 on MidLayer2 "STRIP1_L03_P232" (solid, remove dead copper, pour order 232): 63.498,24.95 63.498,17.7 60.748,14.95 52.748,14.95 35.998,-1.8 35.998,-2.3 -2.502,-2.3 -2.502,18.2 3.498,24.2 3.498,26.95 5.498,28.95 38.748,28.95 45.785,35.987 45.785,76.387 9.861,76.387 4.198,82.05 4.198,84.45 1.723,86.925 1.723,91.7 62.748,91.7 62.748,84 55.698,84 53.748,82.05 53.748,34.7 59.498,28.95
P2V5 on MidLayer2 "P2V5_L03_P169" (solid, remove dead copper, pour order 169): 140.199,24.249 146.651,24.249 148,22.9 148,20.45 145.447,17.897 140.225,17.95 131.248,17.95 121.998,27.2 121.998,29.4 122.9,30.3 122.9,33.275 127.05,37.425 127.875,37.425 128.775,36.525 128.775,35.6 128.787,35.588 128.787,32.412 131.248,29.95 134.498,29.95
P12V0 on MidLayer2 "P12V0_L03_P235" (solid, remove dead copper, pour order 235): 216.248,-2.825 168.25,-2.825 168.25,12 183.948,12 195.023,0.925 216.248,0.925
P3V3_CLK_MUX on MidLayer2 "P3V3_CLK_MUX_L03_P222" (solid, remove dead copper, pour order 222): 101.748,81.2 101.748,86.45 103.748,88.45 109.498,88.45 111.498,86.45 111.498,80.95 109.748,79.2 103.748,79.2
no net on BottomLayer "BAL_BOT" (solid, pour order 241): -0.477,91.444 216.498,91.444 216.498,-3.077 3.829,-3.077 3.752,-3.001 1.441,-0.69 1.441,2.079 -5.865,2.079 -5.53,80.769 -0.477,85.823
P12V0_SMPS on BottomLayer "P12V0_SMPS_L06_P197" (solid, remove dead copper, pour order 197): 138.325,-2.55 138.5,-2.375 138.5,2.375 122.175,18.7 111.3,18.7 104.675,12.075 90.373,12.075 83.998,18.45 75.998,18.45 73.748,16.2 73.748,4.95 74.748,3.95 84.748,3.95 88.248,7.45 112.25,7.45 122.25,-2.55
P1V0 on BottomLayer "P1V0_L06_P198" (solid, remove dead copper, pour order 198): 104.05,20.5 104.85,19.7 109,19.7 109.5,19.2 109.5,17.3 108.8,16.6 103.1,16.6 102.7,17 96.6,17 95.748,17.852 95.748,18.212 95.748,45.2 93.998,46.95 93.998,57.95 95.498,59.45 100.498,59.45 100.498,57.45 98.498,57.45 98.498,51.7 99.498,51.7 99.498,43.2 100.248,42.45 100.248,21.315 101.122,20.5
MGTAVCC on BottomLayer "MGTAVCC_L06_P209" (solid, remove dead copper, pour order 209): 95.748,17.3 96.548,16.5 102,16.475 102.025,16.475 102.9,15.6 103.8,15.6 105,14.4 105,13 104.2,12.2 101.5,12.225 92.175,12.225 91.498,12.95 90.661,13.787 90.661,19.538 91.498,20.375 91.498,59.45 94.498,62.45 99.998,62.45 100.498,61.95 100.498,61.45 98.498,59.45 95.498,59.45 95.498,59.2 93.998,57.7 93.998,46.95 95.748,45.2
MGTAVTT on BottomLayer "MGTAVTT_L06_P219" (solid, remove dead copper, pour order 219): 107.524,22.424 111.176,22.424 112.1,21.45 126.8,21.45 137.4,10.85 137.4,9.25 136.825,8.675 134.8,8.675 124.805,18.67 115.225,18.7 109.45,18.7 107.987,20.163 105.037,20.163 102.5,22.7 102.5,24.875 102.498,24.877 102.498,60.45 101.498,60.45 99.498,62.45 98.498,62.45 98.498,65.575 100.775,65.575 105.498,60.852 105.498,46.45 106.498,45.45 106.498,23.45
VCCBRAM on BottomLayer "VCCBRAM_L06_P210" (solid, remove dead copper, pour order 210): 100.248,21.35 102.088,21.35 102.498,21.912 102.498,35.2 101.498,35.2 101.498,42.45 100.498,43.45 100.498,52.2 99.748,52.95 99.748,57.7 99.248,57.7 98.806,57.258 98.806,52.142 99.498,51.45 99.498,50.8 99.398,50.7 98.85,50.7 98.85,49.95 98.825,49.925 99.425,49.925 99.498,49.85 99.498,43.2 100.248,42.45
P1V8 on BottomLayer "P1V8_L06_P212" (solid, remove dead copper, pour order 212): 101.498,35.2 101.498,39.45 102.498,39.45 102.498,36.95 103.498,35.95 103.498,35.2
VCCAUX on BottomLayer "VCCAUX_L06_P211" (solid, remove dead copper, pour order 211): 100.748,60.45 102.498,60.45 102.498,57.45 102.498,40.95 103.998,40.95 103.998,40.2 102.748,40.2 102.498,39.95 101.498,39.95 101.498,42.45 100.498,43.45 100.498,51.7 100.748,51.95 100.748,57.7
VTT_DDR3 on BottomLayer "VTT_DDR3_L06_P223" (solid, remove dead copper, pour order 223): 116.498,65.7 117.248,64.95 121.998,64.95 122.248,64.7 122.248,54.875 123.248,54.875 123.248,62.45 123.748,62.95 125.248,62.95 126.498,61.7 126.498,55.2 126.248,54.95 126.248,53.45 127.748,53.45 127.998,53.7 127.998,61.7 125.4,64.298 125.4,69.469 124.525,69.469 124.525,68.344 122.256,66.45 118.498,66.45 118.248,66.7 118.248,67.7 116.498,67.7
VADJ_FMC on BottomLayer "VADJ_FMC_L06_P234" (solid, remove dead copper, pour order 234): 54.248,29.7 55.308,30.76 63.813,30.76 64.998,29.575 56.873,21.45 54.248,21.45
GND on BottomLayer "GND_L06_P147" (solid, remove dead copper, pour order 147): 202.35,46.3 202.35,42.575 216.9,42.575 216.9,46.3
STRIP3 on BottomLayer "STRIP3_L06_P176" (solid, pour order 176): 214.531,-4.55 214.548,-4.55 215.788,-3.31 116.998,-3.31 116.998,-4.55
STRIP2 on BottomLayer "esd1" (solid, pour order 177): 79.931,-4.55 96.998,-4.55 96.998,-3.281 41.998,-3.281 41.998,-4.55
STRIP1 on BottomLayer "esd1" (solid, pour order 175): -2.752,0.94 4.373,0.94 4.373,-3 36.998,-3 36.998,-4.5 -2.752,-4.5
no net on SignalLayer1 "ML1_BAL" (solid, pour order 239): 2.929,91.894 215.868,91.894 215.926,-2.389 62.983,-2.389 2.929,-2.389 2.929,2.614 -0.269,2.614 -5.9,8.244 -5.9,70.678 -0.867,75.711 -0.867,86.434 2.929,86.434
P12V0 on SignalLayer1 "P12V0_L04_P221" (solid, remove dead copper, pour order 221): 216.248,-2.825 168.25,-2.825 168.25,12 183.948,12 195.023,0.925 216.248,0.925
P3V3_ADCLK on SignalLayer1 "P3V3_ADCLK_L04_P170" (solid, remove dead copper, pour order 170): 82.498,77.45 87.248,77.45 89.498,79.7 89.498,87.45 88.748,88.2 83.248,88.2 82.498,87.45
P12V0 on MidLayer1 "P12V0_L02_P208" (solid, remove dead copper, pour order 208): 100.528,1.428 102.955,1.428 107.129,-2.746 216.004,-2.746 216.004,0.754 194.741,0.991 180.504,15.228 171.004,15.228 171.004,91.754 124.254,91.754 124.254,86.254 125.754,84.754 144.754,84.754 156.504,73.004 156.504,21.052 136.629,21.052 136.629,7.454 130.829,1.654 127.554,1.654 126.187,2.971 122.92,2.971 120.528,5.378 120.252,5.656 120.252,5.704 118.227,7.729 106.729,7.729 98.129,16.329 96.404,16.329 95.288,17.445 92.845,17.445 91.177,19.113 91.177,20.504 77.227,34.454 68.502,34.454 67.002,35.954 66.002,35.954 66.002,31.954 68.002,31.954 71.752,28.204 71.752,26.454 77.502,20.704 81.252,20.704
P3V3 on MidLayer1 "P3V3_L02_P217" (solid, remove dead copper, pour order 217): 103.772,19.5 121.05,19.5 122.248,20.75 122.248,29.95 106.498,29.95 106.498,21.35 105.575,21.35 102.7,24.225 99.725,24.225 99.725,23.925 95.15,19.35 95.15,17.875 96.225,16.8 99,16.8 99.95,17.75 99.95,21.475 100.775,22.3 102.525,22.3 102.975,21.85 102.975,20.3
VADJ_FMC on MidLayer1 "VADJ_FMC_L02_P220" (solid, remove dead copper, pour order 220): 112.425,75.717 112.508,75.8 112.85,75.8 113.025,75.625 113.025,75.325 112.9,75.2 112.748,75.2 112.748,63.95 114.498,63.95 114.498,63.2 113.748,63.2 111.998,61.45 102.498,61.45 102.498,49.45 105.498,49.45 105.998,48.95 105.998,47.95 106.998,46.95 106.998,36.7 102.248,36.7 99.998,34.45 67.748,34.45 67.748,35.95 65.998,35.95 65.998,34.45 64.998,34.45 63.748,33.2 63.748,28.276 60.46,24.988 60.46,19.95 64.498,15.912 64.498,4.45 56.498,4.45 50.011,10.937 50.011,27.187 52.011,29.187 52.161,66.237 61.248,75.325 66.36,75.325 67.985,76.95 78.248,76.95 79.998,75.2 87.248,75.2 89.248,73.2 105.998,73.2 108.481,75.717
VCCBRAM on MidLayer1 "VCCBRAM_L02_P204" (solid, remove dead copper, pour order 204): 100.323,17.075 103.85,13.547 103.812,10.887 106.748,7.95 108.248,7.95 108.248,12.5 108.224,12.524 108.2,15.325 104.95,18.575 103.987,18.575 102.437,20.125 102.437,21.562 102,22 100.8,22 100.325,21.525 100.325,20.25 100.35,20.225
P3V3 on MidLayer1 "P3V3_L02_P216" (solid, remove dead copper, pour order 216): 93.998,-2.05 89.498,2.45 58.498,2.45 49.998,10.95 49.998,27.2 51.998,29.2 51.998,66.4 61.473,75.475 66.523,75.475 68.048,77 78.248,77 80.023,75.225 87.273,75.225 87.998,74.5 90.023,72.475 101.748,72.475 102.773,73.5 106.248,73.5 108.473,75.725 112.998,75.725 112.998,63.95 114.498,63.95 117.998,67.45 117.998,68.95 122.249,73.201 125.25,73.201 127.975,70.476 127.975,49.5 129.75,47.726 129.75,42.698 129.75,21.474 156.248,21.474 156.248,73.027 144.775,84.5 125.75,84.5 124,86.25 124,91.95 44.498,91.95 44.498,35.425 7.473,35.425 3.248,31.2 3.248,23.125 -3.677,23.125 -3.677,4.2 -2.639,3.162 -2.639,-2.05 44.498,-2.05
GND on MidLayer1 "GND_L02_P225" (solid, remove dead copper, pour order 225): 216.248,0.95 194.998,0.95 180.498,15.45 171,15.45 171,91.7 216.248,91.7
P3V3_FMC on MidLayer1 "P3V3_FMC_L02_P206" (solid, remove dead copper, pour order 206): 95.987,5.762 102.363,5.762 105.675,2.45 105.675,-1.35 104.55,-2.475 104.25,-2.175 94.025,-2.175 94.025,-2.075 94.062,-2.038 89.574,2.45 66.536,2.45 64.536,4.45 64.536,15.874 63.748,16.662 63.748,33.45 64.748,34.45 66.248,34.45 66.248,31.95 67.998,31.95 71.748,28.2 71.748,26.45 77.373,20.825 80.923,20.825
P2V5 on MidLayer1 "P2V5_L02_P202" (solid, remove dead copper, pour order 202): 105.5,21.45 103.525,23.425 103.498,24.25 103.498,36.6 106.998,36.6 106.998,46.95 105.998,47.95 105.998,48.95 105.498,49.45 101.498,49.45 101.498,53.2 102.498,53.95 103.248,53.95 104.748,52.45 106.998,52.45 107.998,51.45 112.498,51.45 125.248,38.7 125.248,18.725 130.95,13.023 130.95,1.65 130.35,1.05 128.25,1.05 127.8,1.5 127.8,12.325 122.225,17.9 122.224,18.676 122.248,18.7 122.248,29.95 106.498,29.95 106.498,21.45
P1V0 on MidLayer1 "P1V0_L02_P213" (solid, remove dead copper, pour order 213): 98.498,58.45 96.498,58.45 95.498,57.45 95.498,50.45 96.498,49.45 98.498,49.45
MGTAVCC on MidLayer1 "MGTAVCC_L02_P214" (solid, remove dead copper, pour order 214): 94.498,62.45 94.498,61.45 95.498,60.45 97.498,60.45 98.498,61.45 98.498,62.45
MGTAVTT on MidLayer1 "MGTAVTT_L02_P218" (solid, remove dead copper, pour order 218): 92.498,63.45 92.498,64.45 92.598,64.55 99.498,64.55 99.498,63.45
P1V8 on MidLayer1 "P1V8_L02_P215" (solid, remove dead copper, pour order 215): 91.323,18.966 92.918,17.37 103.498,27.95 103.498,36.6 99.498,36.6 99.498,31.7 91.323,23.525
P1V5 on MidLayer1 "MidLayer1-P1V5" (solid, remove dead copper, pour order 242): 129.498,21.325 129.823,21 136.425,21 136.425,17.775 136.15,17.5 126.595,17.525 125.248,18.872 125.248,38.7 114.773,49.175 112.498,51.45 107.498,51.45 106.498,52.45 104.998,52.45 103.498,53.95 102.498,53.95 102.498,59.45 104.498,61.45 111.998,61.45 113.748,63.2 114.498,63.2 114.498,63.95 117.998,67.45 117.998,68.95 122.245,73.197 125.147,73.197 127.825,70.519 127.825,49.2 127.998,49.2 129.498,47.7
GND on Internal Plane 1 (split plane): 216.39,92.239 216.39,-3.339 214.689,-5.04 118.625,-5.04 118.625,-3.05 118.616,-3.001 118.588,-2.96 118.547,-2.932 118.498,-2.923 40.801,-2.923 38.588,-0.71 38.547,-0.682 38.498,-0.673 36.498,-0.673 36.449,-0.682 36.408,-0.71 36.38,-0.751 36.371,-0.8 36.371,-5.04 -2.99,-5.04 -2.99,3.8 -2.99,3.801 -2.99,3.803 -2.995,3.851 -2.999,3.9 -3,3.901 -3,3.902 -3.014,3.949 -3.028,3.995 -3.029,3.997 -3.03,3.998 -3.053,4.041 -3.076,4.084 -3.076,4.085 -3.077,4.086 -3.108,4.123 -3.139,4.161 -3.14,4.162 -3.141,4.163 -3.179,4.193 -3.216,4.224 -3.218,4.225 -3.219,4.226 -5.49,5.725 -5.49,23.29 -3.002,23.29 0.998,23.29 0.999,23.29 1.217,23.299 1.434,23.328 1.648,23.375 1.857,23.441 2.059,23.525 2.253,23.626 2.438,23.744 2.612,23.877 2.773,24.025 2.921,24.186 3.054,24.36 3.172,24.545 3.273,24.739 3.357,24.941 3.423,25.15 3.47,25.364 3.499,25.581 3.508,25.799 3.508,25.8 3.508,31.089 7.509,35.09 43.898,35.09 43.9,35.09 44.067,35.099 44.234,35.127 44.397,35.174 44.553,35.239 44.702,35.321 44.84,35.419 44.966,35.532 45.079,35.658 45.177,35.796 45.259,35.945 45.324,36.101 45.371,36.264 45.399,36.431 45.408,36.598 45.408,36.6 45.408,73.5 45.408,73.502 45.399,73.669 45.371,73.836 45.324,73.999 45.259,74.155 45.177,74.304 45.079,74.442 44.966,74.568 44.84,74.681 44.702,74.779 44.553,74.861 44.397,74.926 44.234,74.972 44.067,75.001 43.9,75.01 43.898,75.01 7.509,75.01 3.508,79.011 3.508,83.25 3.508,83.251 3.499,83.469 3.47,83.686 3.423,83.9 3.357,84.109 3.273,84.311 3.172,84.505 3.054,84.69 2.921,84.864 2.773,85.025 2.612,85.173 2.438,85.306 2.253,85.424 2.059,85.525 1.857,85.609 1.648,85.675 1.434,85.722 1.217,85.751 0.999,85.76 0.998,85.76 -2.99,85.76 -2.99,93.94 214.689,93.94
STRIP3 on Internal Plane 1 (split plane): 40.658,-3.14 40.686,-3.159 40.699,-3.168 40.748,-3.177 118.371,-3.177 118.371,-5.04 36.625,-5.04 36.625,-0.927 38.445,-0.927

## Keep-outs
Keep-Out Layer:
  drawing of 8348 lines, arcs and shapes, not listed

## Other copper
TopLayer:
  region net P2V5: 128.248,1.95 128.248,0.425 130.248,0.425 130.248,1.95
  rectangle net P1V8: 91.698,16.95 93.398,19.025
  rectangle net CK_MMCX_IN_P: 175.645,58.474 175.774,59.067
  rectangle net NetJ4_2: 177.068,55.908 177.271,56.518
  rectangle net CK_MMCX_IN_N: 175.619,55.916 175.772,56.526
  rectangle net NetC3_2: 177.169,58.474 177.271,59.058
  region net P12V0_SMPS: 119.6,12.8 120.6,12.8 121.141,12.259 121.141,11.044 120.744,11.044 120.6,10.9 120.6,10.6 120.544,10.544 118.056,10.544 116.8,11.8 116.8,12.4 117,12.6 119.4,12.6
  region net MGTAVCC: 102.5,15.7 102.5,13.6 103,13.1 105.7,13.1 105.7,14.5 105.5,14.7 104.6,14.7 103.8,15.5 103.8,15.7
  region net P1V0: 105.4,20.3 105.4,16.1 109.6,16.1 109.6,20.3
  region net P1V0_NF: 95.7,18 97.1,18 97.9,18.8 97.9,19.5 98.4,20 101.5,20 101.8,20.3 105,20.3 105,16.2 104.7,15.9 97.8,15.9 97.3,15.4 95.7,15.4
  region net GND: 99.725,5.1 99.6,4.975 95.5,4.975 95.325,5.15 95.325,18 93.75,18 93.75,3.975 94.4,3.325 99.25,3.325 100.3,4.375 100.3,7.3 99.957,7.643 99.957,8.657 100.75,9.45 101.45,9.45 101.45,9.8 100.85,9.8 99.9,10.75 99.9,11.525 99.624,11.525 99.624,10.499 99.325,10.2 99.325,8.7 99.15,8.525 99.15,7.525 99.725,6.95
  region net NetC60_1: 98.625,11.45 98.175,11.9 97.625,11.9 97.5,12.025 97.5,14.35 97.8,14.65 101.4,14.65 101.4,13.575 101.05,13.225 99.511,11.686 99.511,10.611 99.225,10.325 99.225,8.775 99.025,8.575 99.025,7.875 98.675,7.875 98.675,8.55 98.775,8.65 98.775,10.65 98.625,10.8
  region net P12V0_SMPS: 97.25,13 97.25,10.75 97.75,10.25 98.5,10.25 98.5,7.5 99,7 99.25,7 99.5,6.75 99.5,5.25 95.5,5.25 95.5,13
MidLayer1:
  pour cut-out: 85.368,13.85 85.429,13.789 85.675,13.789 85.675,14.036 85.7,14.061 85.246,14.061
  pour cut-out: 77.248,3.7 77.248,4.2 77.998,4.2 77.498,3.7
  pour cut-out: 81.748,3.45 82.248,3.45 82.248,3.95 81.748,3.95
  pour cut-out: 127.948,9.559 127.798,9.559 127.798,9.341 127.948,9.341
BottomLayer:
  pour cut-out: 97.206,56.388 97.206,55.778 97.714,55.778 97.739,55.804 97.739,56.134
Internal Plane 1 (plane layer: these items are gaps in the copper):
  rectangle: 106.171,17.678 107.543,19.431
  lines w0.25: 36.498,-5.3 36.498,-0.8 38.498,-0.8 40.748,-3.05 118.498,-3.05 118.498,-5.3